# EAGLE board BatteryConnectBoard (EAGLE 9.7.0)
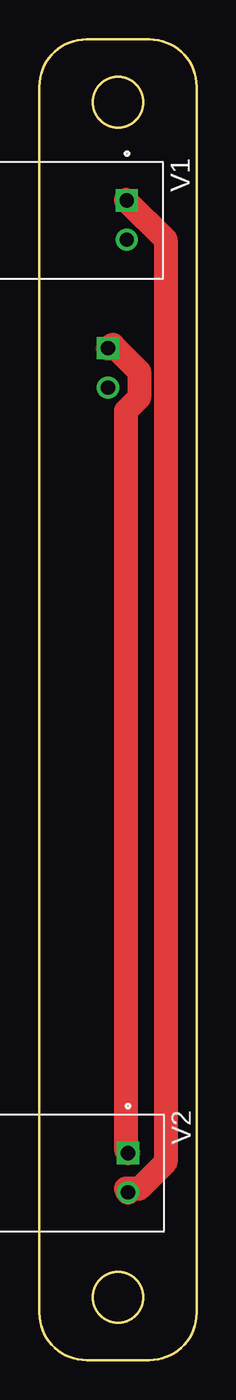
[diagram p0: board, top side]
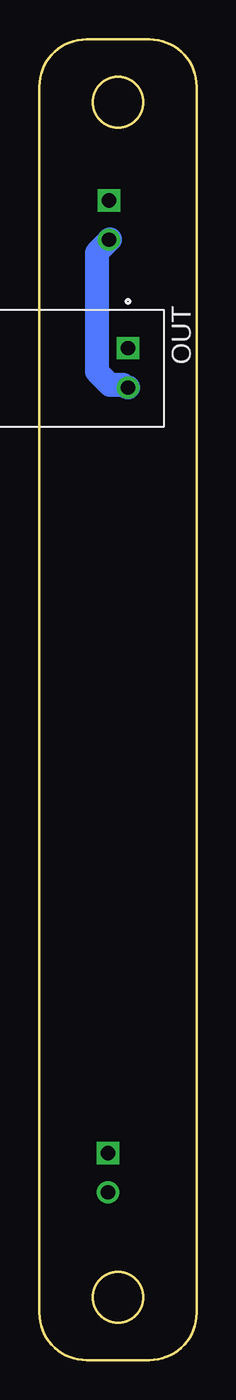
[diagram p1: board, bottom side, seen from below]

Size 10 x 84 mm. Coordinates in mm from the lower left corner, seen from the top.
Outline: 0,3 arc90 3,0 7,0 arc90 10,3 10,81 arc90 7,84 3,84 arc90 0,81 0,3
Outline: circle at 5,4 radius 1.6
Outline: circle at 5,80 radius 1.6
Copper layers (1*16): Top / Bottom
Stack-up Default Layer Stack: Top User Defined 0.035mm / Dielectric-1 User Defined 1.5mm / Bottom User Defined 0.035mm
Design rules: minimum drill size 0.35mm, minimum copper width 60mil, keepout clearance 0mil, drill distance 6mil, via restrict clearance 0mil, dimension clearance 40mil, restrict clearance 0mil, copper clearance wire_polygon to wire_polygon 6mil, copper clearance wire_polygon to pad_smd 6mil, copper clearance wire_polygon to via 6mil, copper clearance pad_smd to pad_smd 6mil, copper clearance pad_smd to via 6mil, copper clearance via to via 6mil, copper clearance smd to pad (same net) 6mil, copper clearance smd to via (same net) 6mil, copper clearance smd to smd (same net) 6mil

## Footprints (pad centres in the part's own frame; a part is rotated, then mirrored left to right if it is on the bottom)
S2B-XH-A = drill 0.9 square: 1 0,0 | drill 0.9: 2 2.5,0

## Placement (x,y rotation side)
OUT  S2B-XH-A  [S2B-XH-A]  4.36,64.35 270 bottom
V1  S2B-XH-A  [S2B-XH-A]  5.57,73.75 270 top
V2  S2B-XH-A  [S2B-XH-A]  5.63,13.17 270 top

## Library data of the parts
OUT V1 V2 = Connector; CATEGORY: Headers; DESCRIPTION: Connector Header Through Hole, Right Angle 2 position 0.098" (2.50mm); MANUFACTURER: JST Sales America Inc.; MPN: S2B-XH-A-1(LF)(SN); OPERATING_TEMPERATURE: -25°C ~ 85°C; PART_STATUS: Active; PITCH: 0.098" (2.50mm); ROHS_COMPLIANCE: ROHS3 Compliant; SERIES: XH; SUB-CATEGORY: Rectangular Connectors; TYPE: Header, Male Pin, Board to Cable/Wire, Through Hole

## Nets
+: OUT.2 V1.2
-: OUT.1 V2.1
N$1: V1.1 V2.2

## Tracks (layer width: path | path; a pad name or v marks a point on that pad's centre or on a via)
+
  Bottom 1.524: OUT.2 4.67,62.04 5.51,62.04 6.35,62.88 6.35,70.42 5.51,71.26 V1.2
-
  Top 1.524: V2.1 5.51,13.43 5.51,60.36 6.35,61.2 6.35,62.88 4.67,64.56 OUT.1
N$1
  Top 1.524: V2.2 5.51,10.91 6.35,10.91 8.02,12.59 8.02,71.26 5.51,73.78 V1.1